# Altium PCB 3PDT_Board.PcbDoc
Units mm, origin at the board's own origin, x right, y up, seen from the top; angles counter-clockwise.
Board outline 29.97 x 42.42 mm, 2 copper layers (Top Layer, Bottom Layer); 3 components, 12 nets, 21 pads, 0 vias.
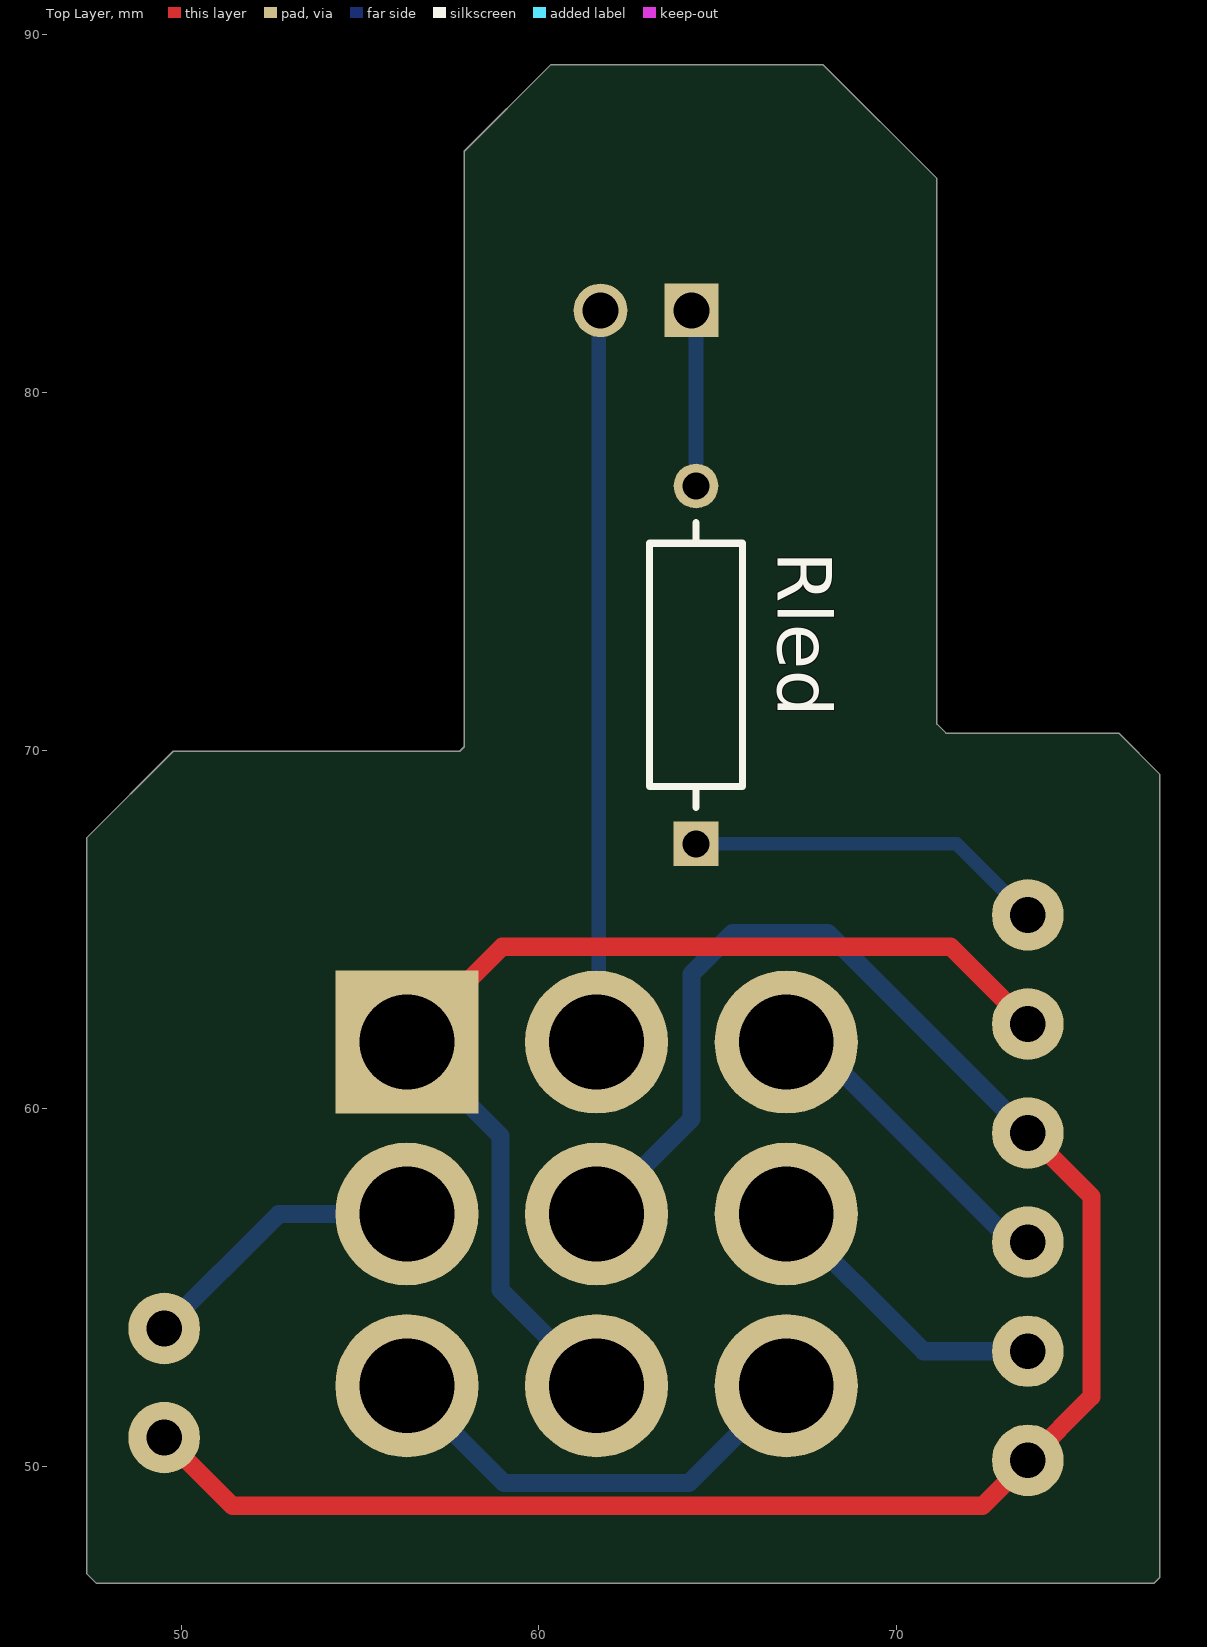
[diagram p0: Top Layer view]
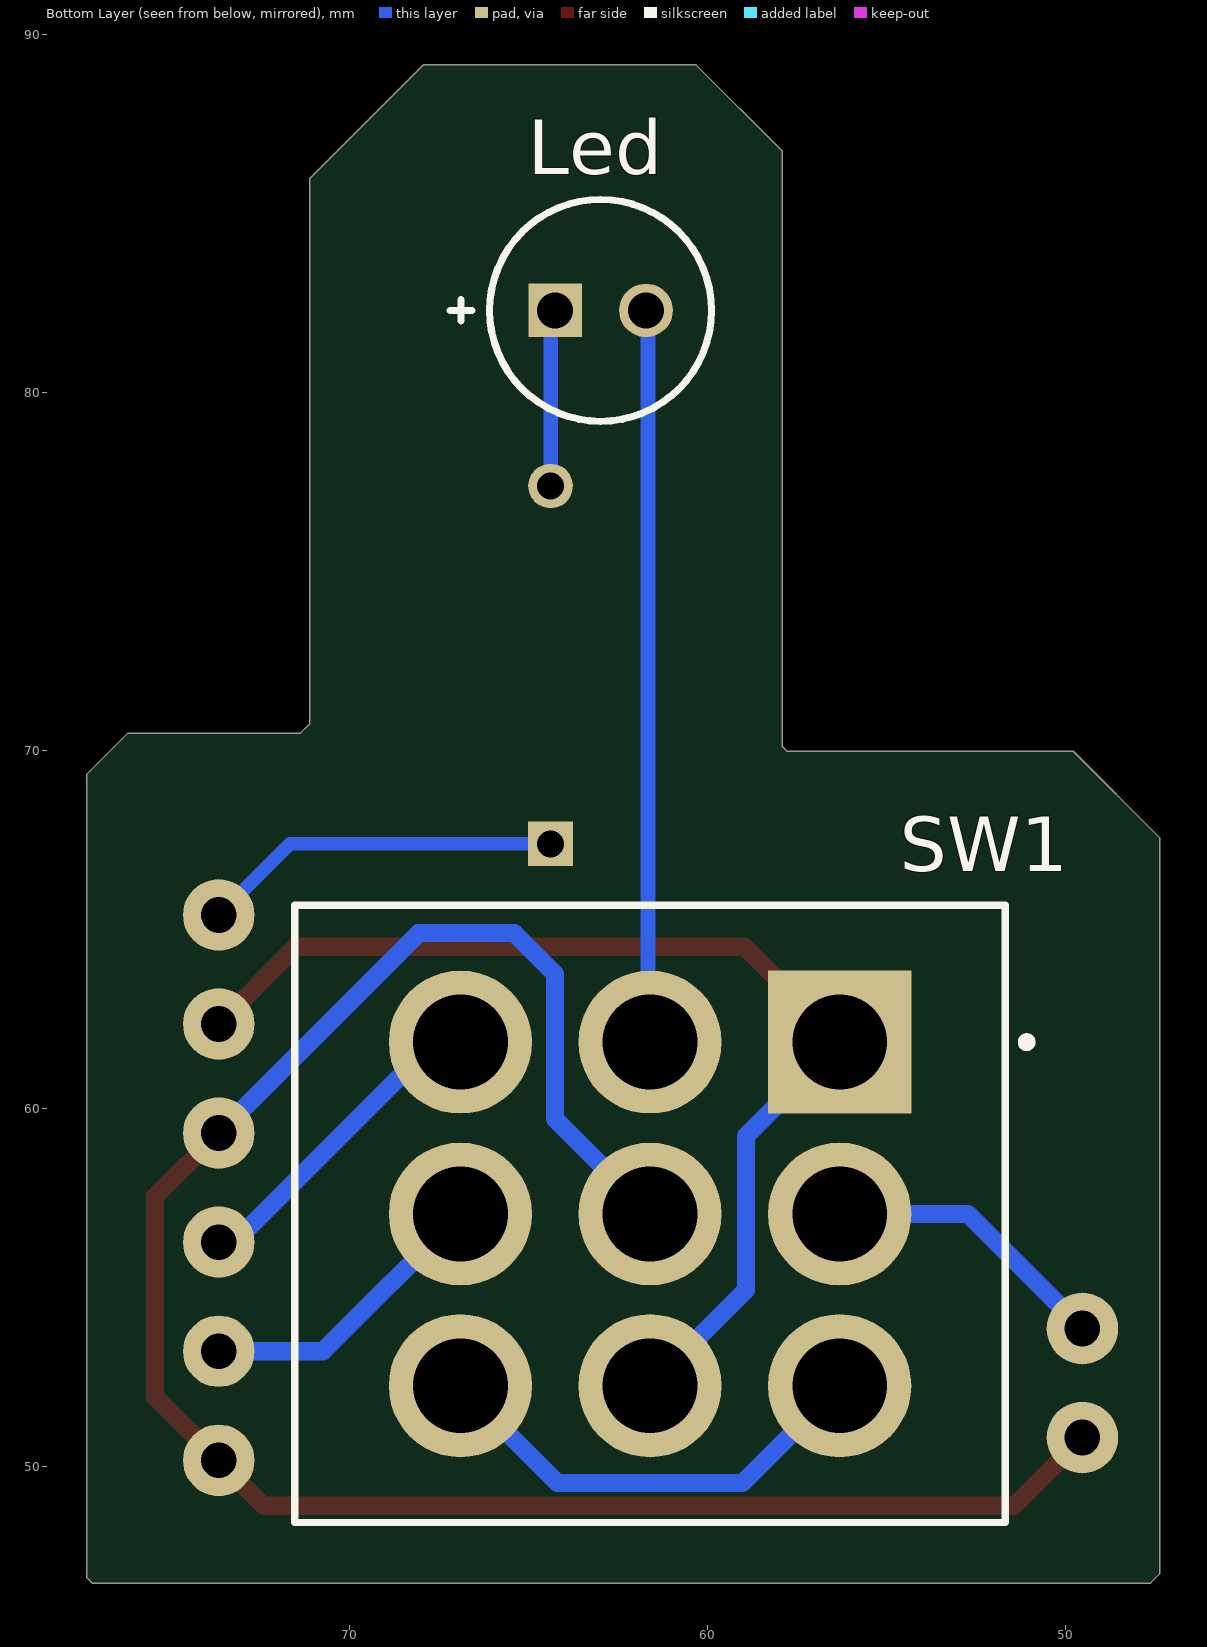
[diagram p1: Bottom Layer view, seen from below]

## Layer stack, top to bottom
Top Solder: solder mask 0.0102, Solder Resist, Dk 3.5
Top Layer: signal copper 0.0356
Dielectric 1: dielectric 0.32, FR-4, Dk 4.5
Bottom Layer: signal copper 0.0356
Bottom Solder: solder mask 0.0102, Solder Resist, Dk 3.5

## Board outline
47.371,46.99 47.371,67.564 49.784,69.977 57.785,69.977 57.912,70.104 57.912,86.741 60.325,89.154 67.945,89.154 71.12,85.979 71.12,70.739 71.374,70.485 76.2,70.485 77.343,69.342 77.343,46.885 77.194,46.736 47.625,46.736

## Design rules (kind name [scope] priority, off if disabled: settings)
Clearance [All] p1: gap=0.127 ignorepadtopadclearanceinfootprint=FALSE
Height [All] p1: minheight=0 maxheight=40 prefheight=12.7
HoleSize [All] p1: absolutevalues=TRUE maxlimit=3 minlimit=0.025 maxpercent=80.000 minpercent=20.000
PolygonConnect [All] p1: connectstyle=Relief reliefconductorwidth=0.254 reliefentries=4 polygonreliefangle="90 Angle" airgapwidth=0.254
RoutingVias [All] p1: holewidth=1 width=2 viastyle="Through Hole" minholewidth=0.3 minwidth=0.6 maxholewidth=1 maxwidth=2
SolderMaskExpansion [All] p1: expansion=0 istentingtop=FALSE
SupplyNets "Schematic Supply Nets" [InNet('GND')] p1: voltage=0.000
Width [All] p1: maxlimit=0.508 minlimit=0.127 preferedwidth=0.254
28 further rules are at their usual default settings.

## Classes and differential pairs
component class 3PDT_Board: Led Rled

## Components (designator, comment, footprint, x,y, rotation, side; value= is the part's Value field where it differs from the comment)
Led "LED" EVRL-IR333C 62.992,82.296 r180 bottom (schematic designator DS1)
Rled "1.5k" FP-CFR-25-MFG 64.389,72.39 r90 top
SW1 "3PDT" FP-FS57003PLT2B2M1QE-MFG 61.61,57.049 r0 bottom

## Footprints (in the part's own frame and the unit in brackets; to place one, negate y for a bottom-side part, rotate by r counter-clockwise, add the part's x,y. Pads: shape width x height; smd on the part's side, far side on the other; paste and mask are expansions set on the pad)
EVRL-IR333C [mm] "TH, 2-Leads, Radius 2.95mm, Pitch 2.54mm"
  rect 1.5x1.5 hole 1: 1(-1.27,0)
  round 1.5 hole 1: 2(1.27,0)
  silkscreen extent -4.2,-3.1 3.1,3.1, body extent -2.95,-2.95 2.95,2.95, height 10.4
FP-CFR-25-MFG [mm]
  rect 1.25x1.25 hole 0.75 paste-2539.97 mask+0: 1(-5,0)
  round 1.25 hole 0.75 paste-2539.97 mask+0: 2(5,0)
  silkscreen extent -3.98,-1.3 3.98,1.3, body extent -5.72,-1.4 5.72,1.4, height 0.25
FP-FS57003PLT2B2M1QE-MFG [mm]
  rect 4x4 hole 2.65 paste-2539.97 mask+0: 1(-5.3,-4.8)
  round 4 hole 2.65 paste-2539.97 mask+0: 2(-5.3,0) 3(-5.3,4.8) 4(0,-4.8) 5(0,0) 6(0,4.8) 7(5.3,-4.8) 8(5.3,0) 9(5.3,4.8)
  silkscreen extent -10.65,-8.62 9.92,8.62, body extent -9.8,-8.5 9.8,8.5, height 39.2

## Part data
Led: library part CMP-2000-05108-1, "Infrared LED, 1.2 V, -40 to 85 degC, 2-Pin Radial, RoHS, Bulk", Forward Current=20mA, Forward Voltage=1.2V, Illumination Color=Infrared, Manufacturer="Everlight Electronics", Maximum Forward Current=1A, Maximum Operating Temperature=+85C, Minimum Operating Temperature=-40C, Package / Case=T-13/4, Power Rating=150mW, Brand=Everlight, Datasheet URL=http://www.everlight.com/file/ProductFile/201407061521223111.pdf, Datasheet Version=May-13, Factory Pack Quantity=500, Lens Shape=Dome, Manufacturer URL=http://www.everlight.com/, Mounting Style=ThroughHole, Operating Voltage=1.2V, Product Category=InfraredEmitters, Radiant Intensity=12mW/sr, RoHS=Details, Viewing Angle=40deg, Wavelength=940nm
Rled: library part CMP-03413-000009-1, "RES 10 OHM 1/4W 5% AXIAL", Case/Package=Axial, Max Operating Temperature=155°C, Max Power Dissipation=250mW, Min Operating Temperature=-55°C, Package Quantity=200, Resistance=10R, Resistor Type="Carbon Film", Temperature Coefficient=500ppm/°C, Tolerance=5%, Length=0.248inch, Number of Terminations=2, Packaging=Bulk, RoHS Compliant=Yes, Series="Carbon Film"
SW1: library part CMP-17874-000002-1, "SWITCH PUSHBUTTON 3PDT 1A 9V", Contact Current Rating=1A, Contact Resistance=50mΩ, Manufacturer=E-Switch, Manufacturer Part Number=FS57003PLT2B2M1QE, Operating Force=3000gf, Temperature="-10°C to +70°C", Temperature Range High=+70°C, Temperature Range Low=-10°C, Voltage Rating Dc=9V, Automotive=No, Category=Switch, ComponentLink2Description=Datasheet, ComponentLink2URL=http://spec_sheets.e-switch.com/specs/ST790000.pdf, Device Class L1=Electromechanical, Device Class L2=Switches, Device Class L3="Pushbutton Switches", Digikey Description="SWITCH PUSHBUTTON 3PDT 1A 9V", Electromechanical Life=30000Cycles, Footprint Url=https://sten-eswitch-13110800-production.s3.amazonaws.com/system/asset/product_line/data_sheet/226/FS5700.pdf, Height=39.2mm, Lead Free=Yes, Mount="Through Hole", Octopart=https://octopart.com/fs57003plt2b2m1qe-e-switch-81236038, Package=FS57003PLT2B2M1QE, RoHS=TRUE, Throw Configuration=3PDT

## Free pads (board coordinates)
  round 2 hole 1: 3(49.53,50.8) 4(49.53,53.848) 5(73.66,65.405) 6(73.66,62.357) 7(73.66,59.309) 8(73.66,56.261) 9(73.66,53.213) 10(73.66,50.165)

## Nets (pads, with @x,y where several pads share a name; then routed paths per layer and width w, separated by ;. In a path a pad name is that pad's centre, name@x,y a point inside that pad or via, vN(x,y) a via of type N, cw(c..) or ccw(c..) an arc to the next point about the centre after c; other vN are vias at no path point)
+9V: pad.5 Rled.1 | length 10.1
  Bottom Layer w0.381: Rled.1 71.675,67.39 pad.5
BYPASS: SW1.3 SW1.9 | length 12.9
  Bottom Layer w0.508: SW1.3 59.029,49.53 64.191,49.53 SW1.9
CI: pad.6 SW1.1 SW1.6 | length 31.1
  Top Layer w0.508: SW1.1 58.977,64.516 71.501,64.516 pad.6
  Bottom Layer w0.508: SW1.1 58.928,59.231 58.928,54.931 SW1.6
CO: pad.8 SW1.7 | length 9.1
  Bottom Layer w0.508: SW1.7 67.634,61.849 73.222,56.261 pad.8
GND: pad.3 pad.7 pad.10 SW1.5 | length 56.1
  Top Layer w0.508: pad.3 51.435,48.895 72.39,48.895 pad.10 75.438,51.943 75.438,57.531 pad.7 pad.7@73.602,59.367
  Bottom Layer w0.508: SW1.5 64.262,59.701 64.262,63.754 65.405,64.897 68.072,64.897 pad.7
JI: pad.4 SW1.2 | length 8.1
  Bottom Layer w0.508: pad.4 52.731,57.049 SW1.2
JO: pad.9 SW1.8 | length 8.3
  Bottom Layer w0.508: SW1.8 70.746,53.213 pad.9
LED-: Led.2 SW1.4 | length 20.5
  Bottom Layer w0.381: SW1.4 SW1.4@61.666,61.905 ; Led.2@61.666,82.24 Led.2
  Bottom Layer w0.406: SW1.4@61.666,61.905 Led.2@61.666,82.24
NetDS1_1: Led.1 Rled.2 | length 5
  Bottom Layer w0.381: Led.1 Led.1@64.389,82.169
  Bottom Layer w0.406: Rled.2 Led.1@64.389,82.169
NetDS1_2: 
NetSW1_1: 
NetSW1_3: 